# Altium PCB 5V_Buck_Final.PcbDoc
Units mil, origin at the board's own origin, x right, y up, seen from the top; angles counter-clockwise.
Board outline 1650 x 925 mil, 2 copper layers (Top Layer, Bottom Layer); 14 components, 9 nets, 38 pads, 11 vias.
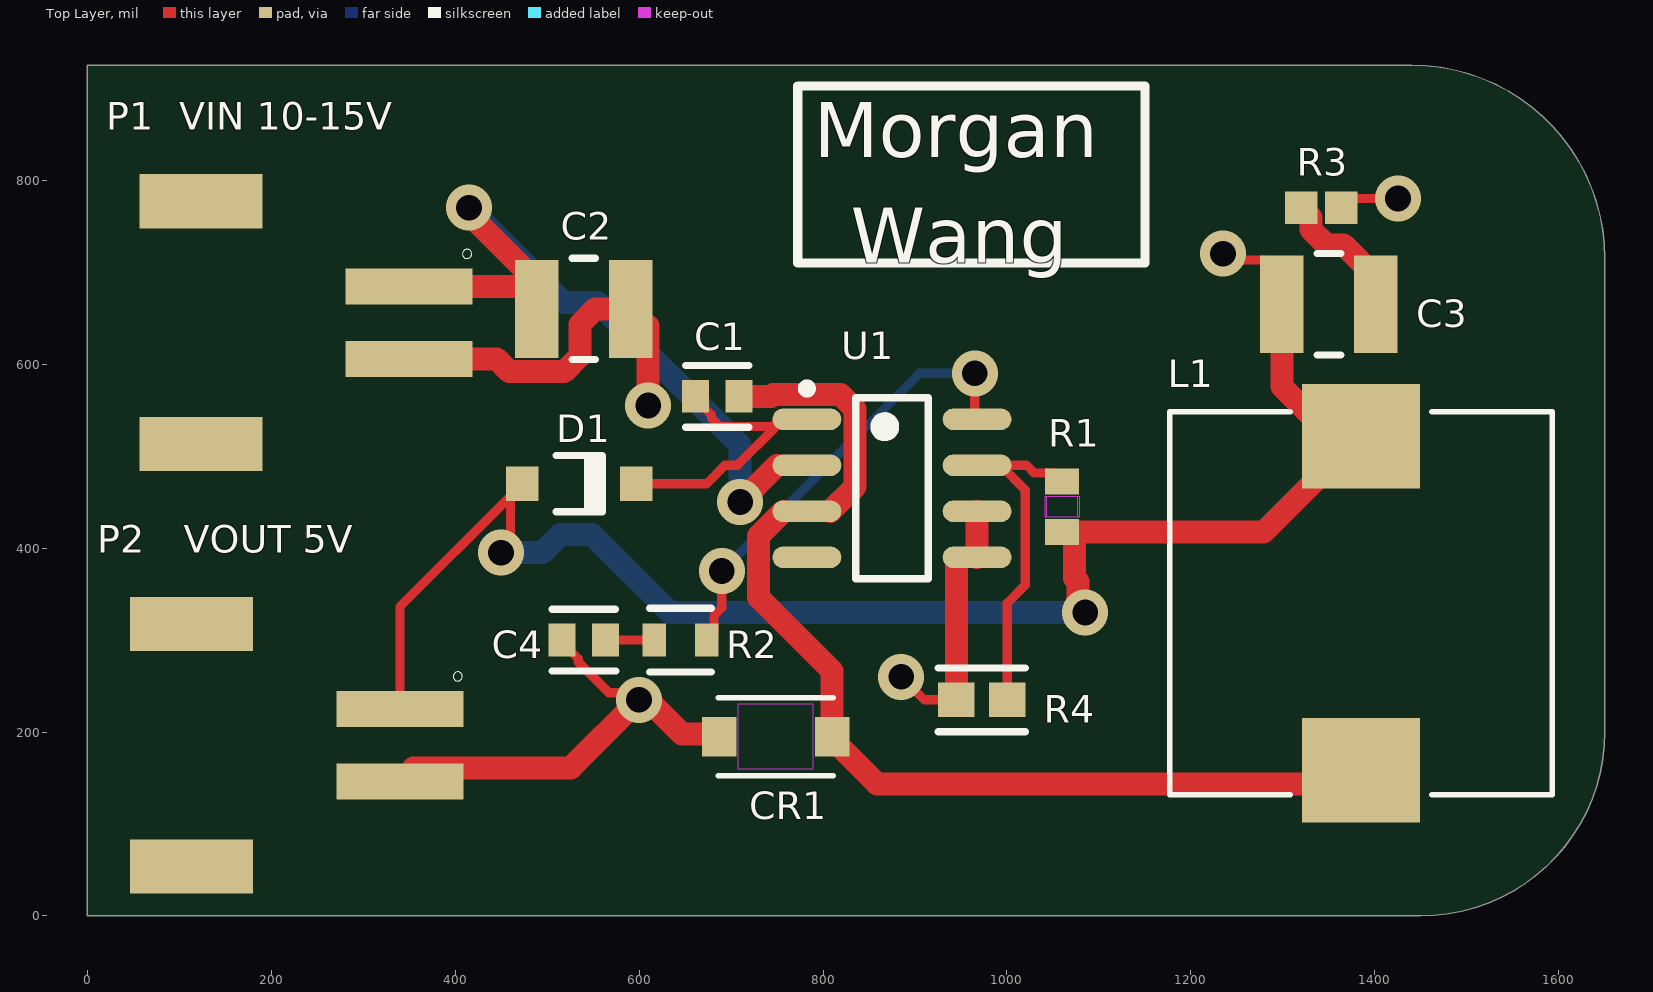
[diagram p0: Top Layer view]
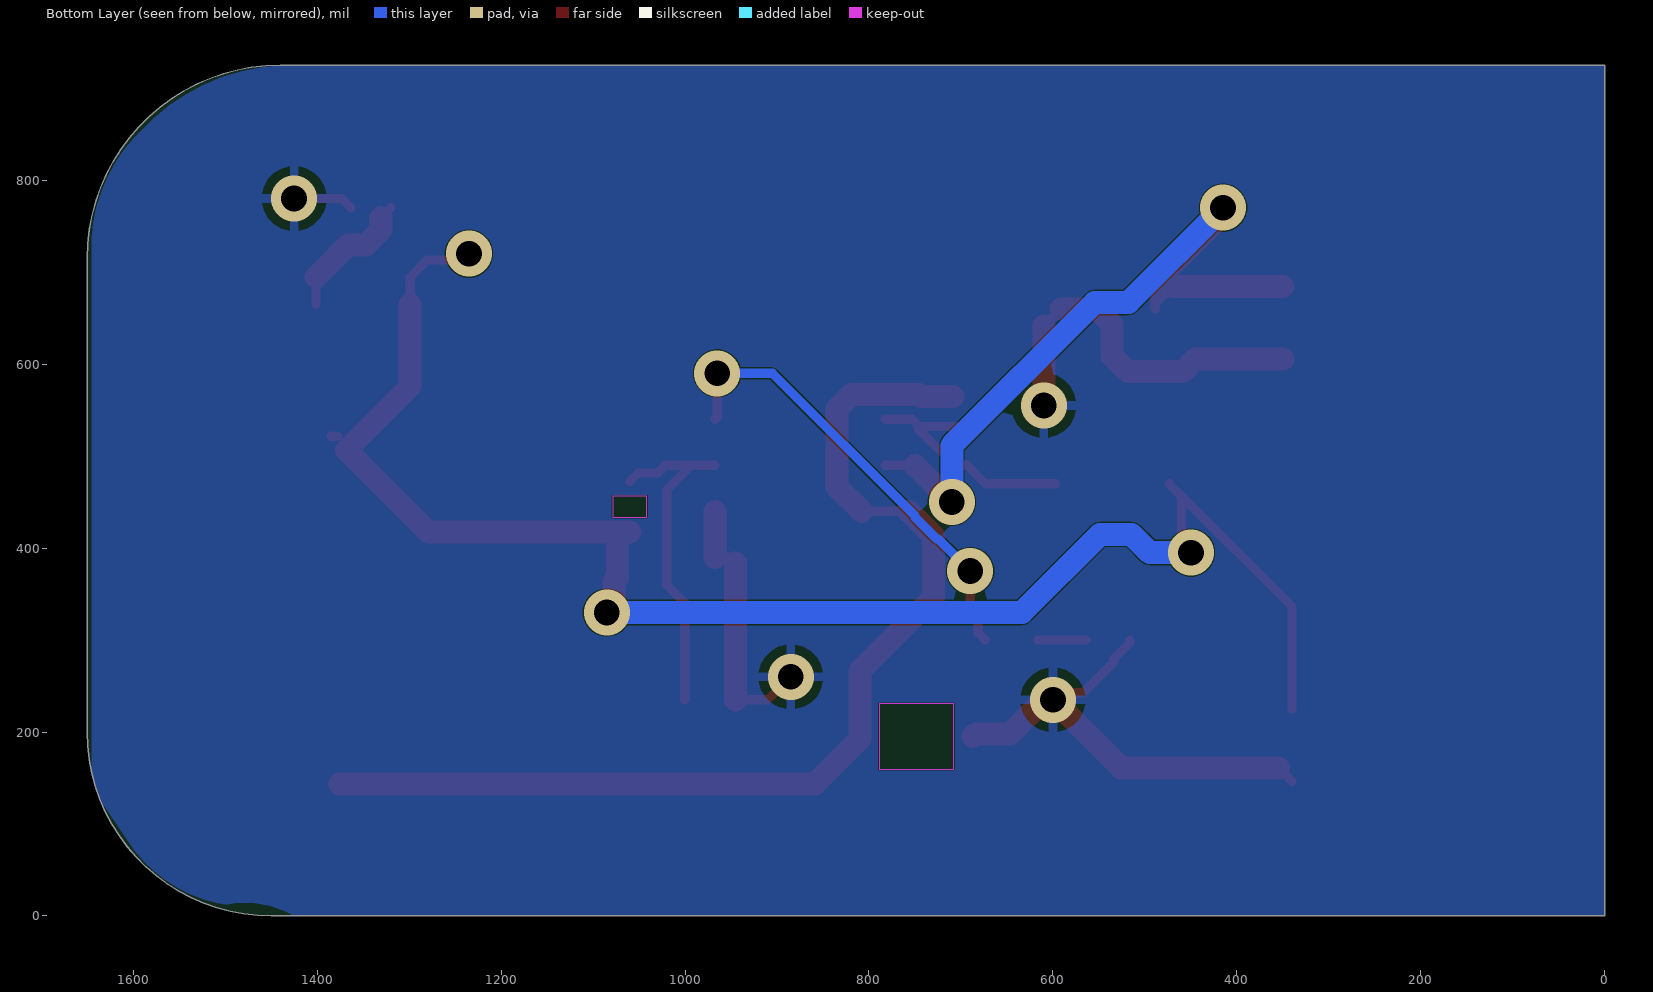
[diagram p1: Bottom Layer view, seen from below]
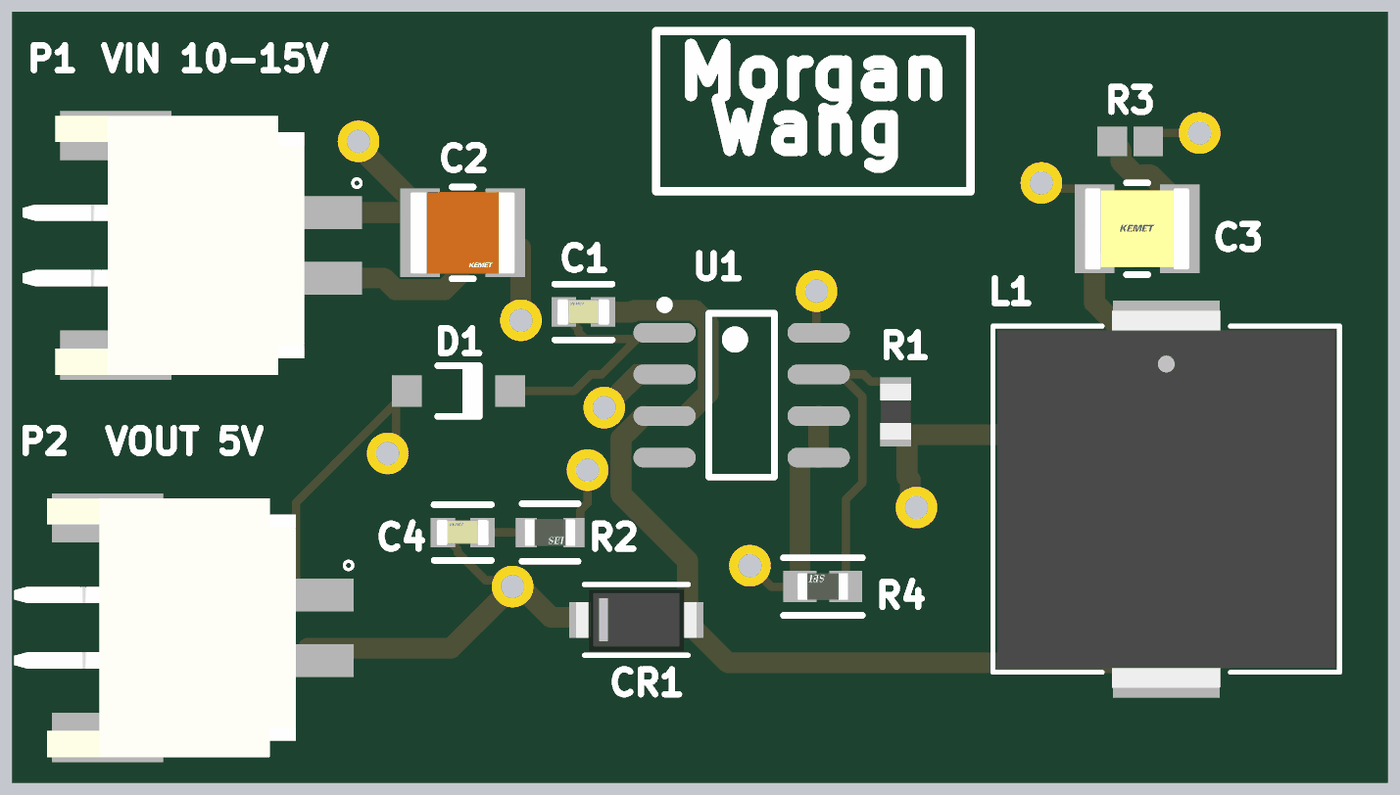
[diagram p2: 3D render of the assembled board from above, using the file's embedded part models]

## Layer stack, top to bottom
Top Solder: solder mask 0.4, Solder Resist, Dk 3.5
Top Layer: signal copper 1.4
Dielectric 1: dielectric 12.6, FR-4, Dk 4.8
Bottom Layer: signal copper 1.4
Bottom Solder: solder mask 0.4, Solder Resist, Dk 3.5

## Board outline
0,0 0,925 1440,925 cw(c1440,715) 1650,715 1650,200 cw(c1450,200) 1450,0

## Design rules (kind name [scope] priority, off if disabled: settings)
Clearance [All] p1: gap=1 ignorepadtopadclearanceinfootprint=TRUE
MinimumSolderMaskSliver [All] p1: minsoldermaskwidth=6
PolygonConnect [All] p1: connectstyle=Relief reliefconductorwidth=10 reliefentries=4 polygonreliefangle="90 Angle" airgapwidth=10
RoutingVias [All] p1: holewidth=28 width=50 viastyle="Through Hole" minholewidth=28 minwidth=50 maxholewidth=28 maxwidth=50
SilkToSilkClearance [All] p1: silktosilkclearance=1
SilkToSolderMaskClearance [IsPad] p1: minsilkscreentomaskgap=1 clearancetoexposedcopper=TRUE
SolderMaskExpansion [All] p1: expansion=0 istentingtop=FALSE
SupplyNets "Schematic Supply Nets" [InNet('GND')] p1: voltage=0.000
Width [All] p1: maxlimit=30 minlimit=10 preferedwidth=10
27 further rules are at their usual default settings.

## Components (designator, comment, footprint, x,y, rotation, side; value= is the part's Value field where it differs from the comment)
C1 "C0603C104K5RACTU" FP-C0603C-CF-MFG 685,565 r0 top value="0.10 μF"
C2 "C1210C226M3RACTU" FP-C1210C226M3RACTU-MFG 540,660 r0 top
C3 "C1210C107M4PACTU" FP-C1210C-FS-MFG 1350,665 r0 top
C4 "C0603C332K5RACTU" FP-C0603C-CF-MFG 540,300 r0 top value="3,300 pF"
CR1 "SS2040FL_R1_00001" CR_R1_00001_PNJ 748.56,195 r180 top
D1 "1N4148W-7-F" DIOD-SOD123-2_V 535,470 r0 top
L1 "SRP1038A-150M" IND_SRP1038A_BRN 1385,340 r270 top
P1 "VIN" JST_S2B-PH-SM4-TB 350,645 r90 top
P2 "VOUT" JST_S2B-PH-SM4-TB 340,185.63 r90 top
R1 "RMCF0603FT5K36" STA_RMCF0603_STP 1060,445 r90 top value=5.36k
R2 "RMCF0603FT1K00" FP-RMCF0603-MFG 645,300 r0 top
R3 "WSL0603R0500FEA18" RESC1508X46X38LL25T25 1341.65,770 r0 top value=0.05
R4 "RMCF0603FT4K99" FP-RMCF0603-IPC_B 972.6,235 r180 top
U1 "LT1375CS8#PBF" LT-S8-8_L 875,465 r0 top

## Footprints (in the part's own frame and the unit in brackets; to place one, negate y for a bottom-side part, rotate by r counter-clockwise, add the part's x,y. Pads: shape width x height; smd on the part's side, far side on the other; paste and mask are expansions set on the pad)
CR_R1_00001_PNJ [mil]
  rect 37.87x43 smd paste+0 mask+0: 1(-61.44,0) 2(61.44,0)
  Top Layer keep-out region: -40.5,-35.5 -40.5,35.5 40.5,35.5 40.5,-35.5
  Keep-Out Layer region: -40.5,-35.5 -40.5,35.5 40.5,35.5 40.5,-35.5
  silkscreen extent -63,-43 63,43, body extent -73,-37 73,37, height 43
DIOD-SOD123-2_V [mm] "SOD123, 2-Leads, Body 2.7x1.55mm, Height 1.45mm"
  rect 0.9x0.95 smd: 1(-1.575,0) 2(1.575,0)
  silkscreen extent -0.64,-0.82 0.64,0.77, body extent -1.35,-0.77 1.35,0.77, height 1.45
FP-C0603C-CF-MFG [mm]
  rect 0.75x0.9 smd paste+0 mask+0: 1(-0.6,0) 2(0.6,0)
  silkscreen extent -0.87,-0.85 0.88,0.85, body extent -1.2,-0.6 1.2,0.6, height 0.25
FP-C1210C226M3RACTU-MFG [mm]
  rect 1.2x2.7 smd paste+0 mask+0: 1(-1.3,0) 2(1.3,0)
  silkscreen extent -0.33,-1.4 0.33,1.4, body extent -2,-1.5 2,1.5, height 0.25
FP-C1210C-FS-MFG [mm]
  rect 1.2x2.7 smd paste+0 mask+0: 1(-1.3,0) 2(1.3,0)
  silkscreen extent -0.33,-1.4 0.33,1.4, body extent -2,-1.5 2,1.5, height 0.25
FP-RMCF0603-IPC_B [mil]
  rect 39.61x37.73 smd paste+0 mask+0: 1(-27.6,0) 2(27.6,0)
  silkscreen extent -47,-35 47,35, body extent -57,-29 57,29, height 10
FP-RMCF0603-MFG [mm]
  rect 0.65x0.9 smd paste+0 mask+0: 1(-0.725,0) 2(0.725,0)
  silkscreen extent -0.85,-0.88 0.85,0.88, body extent -1.15,-0.58 1.15,0.58, height 0.25
IND_SRP1038A_BRN [mil]
  rect 114x128 smd paste+0 mask+0: 1(-181.5,0) 2(181.5,0)
  silkscreen extent -208,-208 208,208, body extent -226,-203 226,203, height 158
JST_S2B-PH-SM4-TB [mm]
  rect 1x3.5 smd: 1(1,0) 2(-1,0)
  rect 1.5x3.4 smd: P1(3.35,5.75) P2(-3.35,5.75)
  silkscreen extent 1.77,-1.73 2.03,-1.47, body extent -3.95,0 3.95,8.6, height 5.5
LT-S8-8_L [mm] "SOIC, 8-Leads, Body 5x4mm, Pitch 1.27mm, IPC High Density"
  oval 1.9x0.6 smd: 1(-2.35,1.905) 2(-2.35,0.635) 3(-2.35,-0.635) 4(-2.35,-1.905) 5(2.35,-1.905) 6(2.35,-0.635) 7(2.35,0.635) 8(2.35,1.905)
  silkscreen extent -2.47,-2.5 1,2.88, body extent -2,-2.5 2,2.5, height 1.76
RESC1508X46X38LL25T25 [mm] "Chip Resistor, 2-Leads, Body 1.52x0.76mm, IPC High Density"
  rect 0.9x0.9 smd: 1(-0.55,0) 2(0.55,0)
  body extent -0.88,-0.51 0.89,0.51, height 0.46
STA_RMCF0603_STP [mil]
  rect 28x37 smd paste+0 mask+0: 1(-27.5,0) 2(27.5,0)
  Top Layer keep-out region: -11.5,-16.5 -11.5,16.5 11.5,16.5 11.5,-16.5
  Keep-Out Layer region: -11.5,-18.5 -11.5,18.5 11.5,18.5 11.5,-18.5
  body extent -34,-19 34,19, height 22

## Part data
C1: library part CMP-2006-03061-2, "CAP CER 0.1UF 50V X7R 0603", Capacitance="0.10 μF", Manufacturer=KEMET, Package=C0603C-CF, Temperature="-55°C to +125°C", Temperature Characteristic=X7R, Temperature Coefficient=30ppm/°C, Temperature Range High=+125°C, Temperature Range Low=-55°C, Tolerance=0.1, Voltage Rating="50 V", Automotive=Yes, Automotive Grade="Grade 1", Category=Cap, ComponentLink2Description=Datasheet, ComponentLink2URL=https://api.kemet.com/component-edge/download/datasheet/C0603C100J5GACAUTO.pdf, Device Class L1="Passive Components", Device Class L2=Capacitors, Device Class L3="Ceramic Capacitors", Digikey Description="CAP CER 0.1UF 50V X7R 0603", Height=0.87mm, Lead Free=Yes, Manufacturer Part Number=C0603C104K5RACTU, Material=Ceramic, Octopart=https://octopart.com/c0603c104k5ractu-kemet-139244, RoHS=TRUE
C2: library part CMP-03020-034666-1, "CAP CER 22UF 25V X7R 1210", Capacitance=22uF, Case Code (Imperial)=1210, Case Code (Metric)=3225, Dielectric=X7R, Dielectric Material=Ceramic, Max Operating Temperature=125°C, Min Operating Temperature=-55°C, Package Quantity=1, Tolerance=20%, Voltage=25V, Case/Package=1210, Depth=2.5mm, Dissipation Factor=5%, Height=2.5mm, Length=3.2mm, Mount="Surface Mount", Packaging="Tape and Reel", REACH SVHC="No SVHC", Series=C, Termination=SMD/SMT, Thickness=0.11inch, Voltage Rating=25V, Voltage Rating (DC)=25V, Width=2.5mm
C3: library part CMP-03020-034653-1, "CAP CER 100UF 16V X5R 1210", Capacitance=100uF, Case Code (Imperial)=1210, Case Code (Metric)=3225, Dielectric=X5R, Dielectric Material=Ceramic, Max Operating Temperature=85°C, Min Operating Temperature=-55°C, Package Quantity=1000, Tolerance=20%, Voltage Rating=16V, Case/Package=1210, Depth=2.5mm, Lead Free="Lead Free", Length=3.2mm, Packaging="Tape and Reel", REACH SVHC="No SVHC", Termination=SMD/SMT, Thickness=0.106inch, Voltage Rating (DC)=16V, Weight=0.000564oz, Width=0.098inch
C4: library part CMP-2006-03179-2, "CAP CER 3300PF 50V X7R 0603", Capacitance="3,300 pF", Manufacturer=KEMET, Package=C0603C-CF, Temperature="-55°C to +125°C", Temperature Characteristic=X7R, Temperature Coefficient=30ppm/°C, Temperature Range High=+125°C, Temperature Range Low=-55°C, Tolerance=0.1, Voltage Rating="50 V", Automotive=Yes, Automotive Grade="Grade 1", Category=Cap, ComponentLink2Description=Datasheet, ComponentLink2URL=https://api.kemet.com/component-edge/download/datasheet/C0603C100J5GACAUTO.pdf, Device Class L1="Passive Components", Device Class L2=Capacitors, Device Class L3="Ceramic Capacitors", Digikey Description="CAP CER 3300PF 50V X7R 0603", Height=0.87mm, Lead Free=Yes, Manufacturer Part Number=C0603C332K5RACTU, Material=Ceramic, Mouser Description="Multilayer Ceramic Capacitors MLCC - SMD/SMT 50volts 3300pF X7R 10%", Octopart=https://octopart.com/c0603c332k5ractu-kemet-135923, RoHS=TRUE
CR1: "Description", Manufacturer_Name=Panjit, Copyright="Copyright (C) 2026 Ultra Librarian. All rights reserved.", Manufacturer_Part_Number=SS2040FL_R1_00001
D1: library part CMP-2000-04932-2, "Fast Switching Diode, 100 V, 0.15 A, -65 to 150 degC, 2-Pin?SOD123, RoHS, Tape and Reel", If - Forward Current=0.15A, Ir - Reverse Current=1uA, Manufacturer=DiodesIncorporated, Max Surge Current=2A, Maximum Operating Temperature=+150C, Minimum Operating Temperature=-65C, Operating Temperature Range=-65Cto+150C, Package / Case=SOD-123, Package Reference=SOD123-2, Peak Reverse Voltage=100V, Vf - Forward Voltage=1.25V, Brand=DiodesIncorporated, Configuration=Single, Datasheet URL=http://www.farnell.com/datasheets/1915529.pdf, Datasheet Version="Rev. 24-2, 10/2013", Factory Pack Quantity=3000, Height=1.25mm, Length=2.85mm, Manufacturer URL=http://www.diodes.com/, Mounting Style=SMD/SMT, Package URL=http://www.diodes.com/datasheets/ds18004.pdf, Packaging=Reel, Product=SwitchingDiodes, Product Category=Diodes-GeneralPurpose,Power,Switching, Recovery Time=4ns, RoHS=True, Series=1N4148, Type=SwitchingDiode, Unit Weight=0.000353oz, Width=1.7mm
L1: "Description", Manufacturer_Name="Bourns Electronics", Copyright="Copyright (C) 2025 Ultra Librarian. All rights reserved.", Manufacturer_Part_Number=SRP1038A-150M, Type="Fixed Inductors"
P1 P2: library part S2B-PH-SM4-TB, "Connector Header Surface Mount, Right Angle 2 position 0.079 (2.00mm)", Package=None, Check_prices=https://www.snapeda.com/parts/S2B-PH-SM4-TB/JST/view-part/?ref=eda, MF="JST Sales", MP=S2B-PH-SM4-TB, SnapEDA_Link=https://www.snapeda.com/parts/S2B-PH-SM4-TB/JST/view-part/?ref=snap
R1: "No Description Available", Manufacturer_Name="Stackpole International", Copyright="Copyright (C) 2026 Ultra Librarian. All rights reserved.", Digi-Key_Part_Number_1=RMCF0603FT5K36CT-ND, Digi-Key_Part_Number_2=RMCF0603FT5K36DKR-ND, Digi-Key_Part_Number_3=RMCF0603FT5K36TR-ND, Manufacturer_Part_Number=RMCF0603FT5K36
R2: library part CMP-26527-000152-1, "1kΩ ±1% 0.1W 0603 Thick Film Chip Resistor AEC-Q200 compliant", Case Code (Imperial)=0603, Case Code (Metric)=1608, Max Operating Temperature=155°C, Max Power Dissipation=100mW, Min Operating Temperature=-55°C, Resistance=1k, Resistor Type="Thick Film", Temperature Coefficient=100ppm/°C, Tolerance=1%, Case/Package=0603, Construction=Rectangular, Contact Plating=Tin, Depth=0.8mm, Features="Automotive AEC-Q200", Height=0.022inch, Lead Free="Lead Free", Length=1.55mm, Military Standard=Not, Mount="Surface Mount", Number of Terminations=2, Packaging="Tape and Reel", Power Rating=100mW, Radiation Hardening=No, RoHS Compliant=Yes, Series=RMCF, Size Code=0603, Width=0.031inch
R3: library part CMP-2000-03813-1, Manufacturer="Vishay Dale", Part Number=WSL0603R0500FEA18
R4: library part CMP-26527-001870-1, "4.99kΩ ±1% 0.1W 0603 Thick Film Chip Resistor AEC-Q200 compliant", Case Code (Imperial)=0603, Case Code (Metric)=1608, Max Operating Temperature=155°C, Max Power Dissipation=100mW, Min Operating Temperature=-55°C, Package Quantity=1, Resistance=4.99kR, Resistor Type="Thick Film", Temperature Coefficient=100ppm/°C, Tolerance=1%, Working Voltage=75V, Case/Package=0603, Construction=Rectangular, Contact Plating=Tin, Depth=0.8mm, Features="Automotive AEC-Q200", Height=0.022inch, Lead Free="Lead Free", Length=1.55mm, Military Standard=Not, Mount="Surface Mount", Number of Terminations=2, Packaging="Tape and Reel", Power Rating=100mW, Radiation Hardening=No, RoHS Compliant=Yes, Series=RMCF, Technology="THICK FILM", Width=0.031inch
U1: library part CMP-0491-01961-1, "1.5 A, 500 kHz Step-Down Switching Regulator, 8-pin SOIC (S8-8), 0 to 125 degC, Pb-Free", Frequency Sync Range="580kHz - 900kHz", Manufacturer="Linear Technology", ComponentLink1Description="Manufacturer URL", ComponentLink1URL=http://www.linear.com/, ComponentLink2Description=Datasheet, ComponentLink2URL=http://cds.linear.com/docs/en/datasheet/13756fd.pdf, ComponentLink3Description="Package Specification", ComponentLink3URL=http://cds.linear.com/docs/en/packaging/05081610_G_SO8.pdf, DatasheetVersion="Rev. D", Mounting Technology="Surface Mount", Number of Outputs=1, PackageDescription="8-Pin Plastic Small Outline (Narrow .150 Inch), Body 4.9 x 3.9 mm, Pitch 1.27 mm", PackageReference=S8-8, PackageVersion="Rev. G, 03/2012", PartNumber=LT1375CS8#PBF, RoHS=TRUE

## Via types
v1: diameter 50, hole 28, Top Layer to Bottom Layer, 11 vias

## Nets (pads, with @x,y where several pads share a name; then routed paths per layer and width w, separated by ;. In a path a pad name is that pad's centre, name@x,y a point inside that pad or via, vN(x,y) a via of type N, cw(c..) or ccw(c..) an arc to the next point about the centre after c; other vN are vias at no path point)
GND: C2.2 C4.1 CR1.2 P1.2 P2.2 R3.2 R4.2 U1.5 U1.6 | length 1284.4
  Top Layer w10: P2.2 P2.2@354.69,160.94 ; C4.1 516.38,297.05 533.86,279.57 533.86,276.07 567.27,242.65 592.35,242.65 v1(600,235) v1@609.57,235 ; C2.2 C2.2@609.8,641.38 ; v1@609.8,555.2 v1(610,555) ; v1(885,260) 885.2,260 910.2,235 R4.2 ; U1.5@945,383.71 951.29,390 U1.5 ; R3.2 1373.31,780 v1(1425,780)
  Top Layer w25: P1.2 445.2,605.63 458.98,591.85 518.65,591.85 535.61,608.8 535.61,643.05 552.56,660 C2.2 ; P2.2@354.69,160.94 525.94,160.94 v1(600,235) ; v1@609.57,235 609.57,232.2 611.55,230.22 614.35,230.22 646.61,197.96 684.17,197.96 CR1.2 ; v1@609.8,555.2 C2.2@609.8,641.38 ; R4.2 U1.5@945,383.71 ; U1.5 U1.6
NetC1_1: C1.1 D1.2 U1.1 | length 317
  Top Layer w10: D1.2 673.43,470 693.43,490 706.89,490 747.33,530.44 ; C1.1 661.38,562.05 678.86,544.57 678.86,541.07 687.64,532.28 745.49,532.28 753.2,540 U1.1
NetC1_2: C1.2 CR1.1 L1.2 U1.3 | length 1184
  Top Layer w10: 743.97,565 745.78,566.81 ; U1.3@756.89,440 U1.3 U1.3@808.07,440 ; CR1.1@810,192.44 CR1.1
  Top Layer w25: C1.2 743.97,565 ; 745.78,566.81 819.18,566.81 834.88,551.11 834.88,466.81 U1.3@808.07,440 ; U1.3@756.89,440 730.08,413.19 730.08,346.26 810,266.34 CR1.1 ; CR1.1@810,192.44 858.94,143.5 L1.2@1375,143.5
NetC2_1: C2.1 P1.1 U1.2 | length 839.8
  Top Layer w10: v1@415,763.35 v1(415,770) ; C2.1@470.2,684.37 C2.1@488.82,665.75 ; C2.1 C2.1@488.82,665.75 ; C2.1@488.82,689.53 C2.1@488.82,665.75 ; U1.2@750,490 753.2,490 U1.2
  Top Layer w25: P1.1 C2.1@470.2,684.37 ; v1@415,763.35 C2.1@488.82,689.53 ; v1(710,450) U1.2@750,490
  Bottom Layer w25: v1(415,770) 518.04,666.96 554.61,666.96 710,511.57 v1(710,450)
NetC3_1: C3.1 D1.1 L1.1 P2.1 R1.1 | length 1788.5
  Top Layer w10: P2.1 340,336.02 460.77,456.79 472.99,469.02 D1.1 ; v1(450,395) 450,405.82 460.28,416.1 D1.1@460.28,457.28 ; R1.1 1064.5,417.5 R1.1@1073.5,408.5 ; 1073.5,367.32 1077.35,363.48 ; v1@1077.35,337.65 v1(1085,330) ; v1(1235,720) 1241.85,713.15 1280.2,713.15 1298.82,694.53 C3.1 ; L1.1@1378,521.5 L1.1
  Top Layer w25: R1.1 1279,417.5 1368,506.5 1298.82,575.68 C3.1 ; 1073.5,367.32 R1.1@1073.5,408.5 ; v1@1077.35,337.65 1077.35,363.48
  Bottom Layer w25: v1(450,395) 494.76,395 514.76,415 548.7,415 633.7,330 v1(1085,330)
NetC3_2: C3.2 R3.1 | length 149.8
  Top Layer w10: R3.1 R3.1@1330.59,759.41 ; C3.2 C3.2@1401.18,694.53
  Top Layer w25: R3.1@1330.59,759.41 1330.59,746.07 1347.05,729.61 1366.1,729.61 C3.2@1401.18,694.53
NetC4_2: C4.2 R2.1 | length 52.8
  Top Layer w10: C4.2 R2.1
NetR1_2: R1.2 R4.1 U1.7 | length 399.6
  Top Layer w10: R4.1 1000.2,340.13 1019.92,359.84 1019.92,463.19 993.11,490 U1.7 1021.39,490 1029.89,481.5 1051,481.5 R1.2
NetR2_2: R2.2 U1.8 | length 497.8
  Top Layer w10: R2.2 681.34,307.8 681.34,326.34 690,335 v1(690,375) ; v1(965,590) 965,542.52 U1.8
  Bottom Layer w10: v1(690,375) 725,410 726.57,410 750,433.43 750,435 905,590 v1(965,590)
pads on no net: P1.P1 P1.P2 P2.P1 P2.P2 U1.4

## Polygon pours and split planes (outlines as drawn)
GND on Bottom Layer "NONET_L01_P001" (solid, pour order 1): 0,0 0,925 1427.58,925 cw(c1427.58,701.89) 1585.36,859.64 1593.43,851.57 cw(c1468.97,727.09) 1645,727.07 1645,170 cw(c1545.02,169.99) 1627.29,113.19 1603.07,78.1 cw(c1473.32,167.67) 1498.9,12.09 ccw(c1476.72,-82.7) 1425.37,0

## Silkscreen, mask and mechanical layers (free items; w line width, h text height)
Top Overlay:
  lines w10: 772.5,710 1150,710 1150,902.5 772.5,902.5 772.5,710
  text "VIN 10-15V" at 100,855 h30
  text "Morgan" at 790,824.99 h60
  text "Wang" at 830,710 h60
  text "VOUT 5V" at 105,395 h30

## Text inside footprints (layer, text, board x,y; h text height)
CR1: Top 3D Body "*" at 808.56,220 h50 r180